# Altium PCB PCB1.PcbDoc
Units mil, origin at the board's own origin, x right, y up, seen from the top; angles counter-clockwise.
Board outline 3425 x 2910 mil, 2 copper layers (Top Layer, Bottom Layer); 8 components, 14 nets, 60 pads, 0 vias.
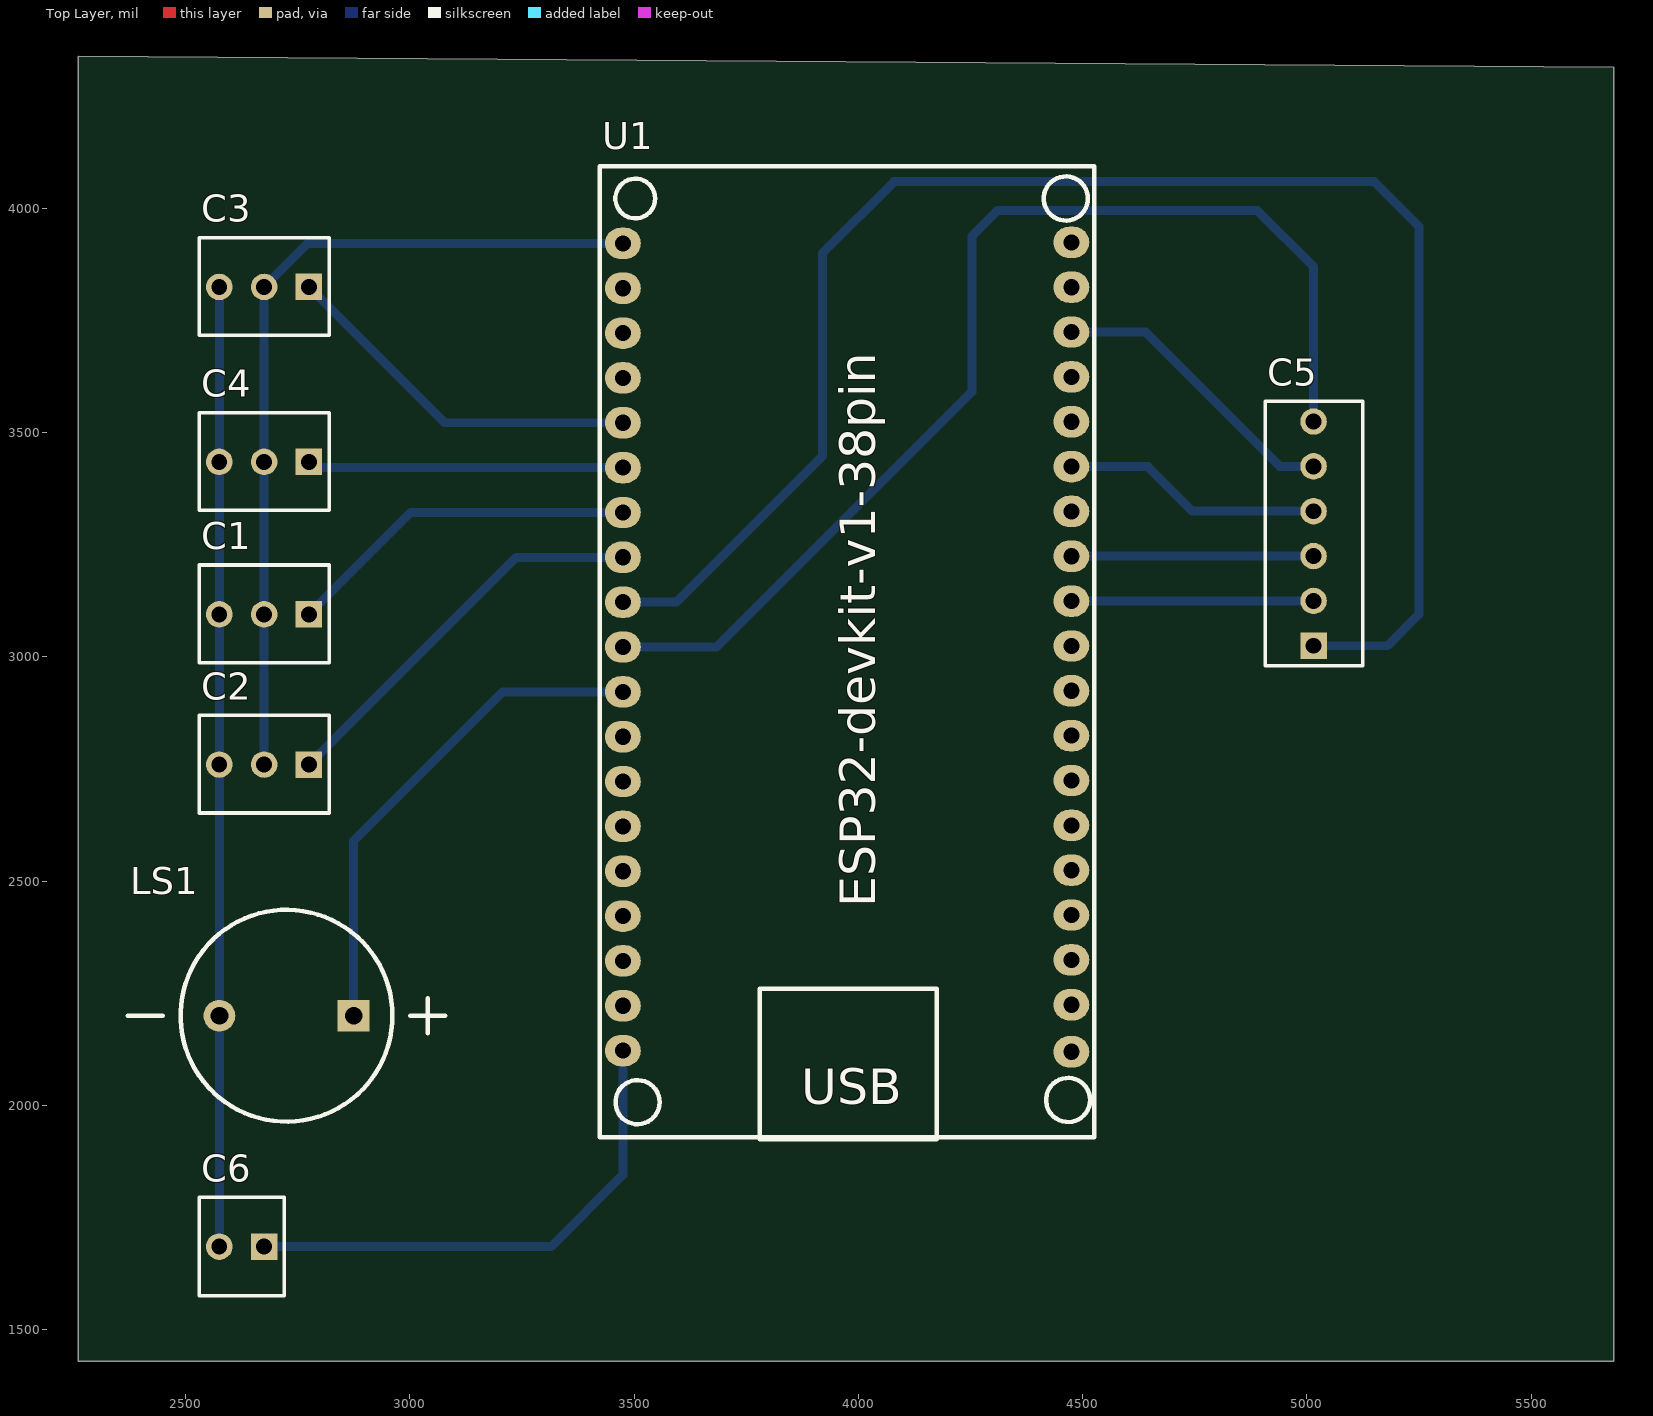
[diagram p0: Top Layer view]
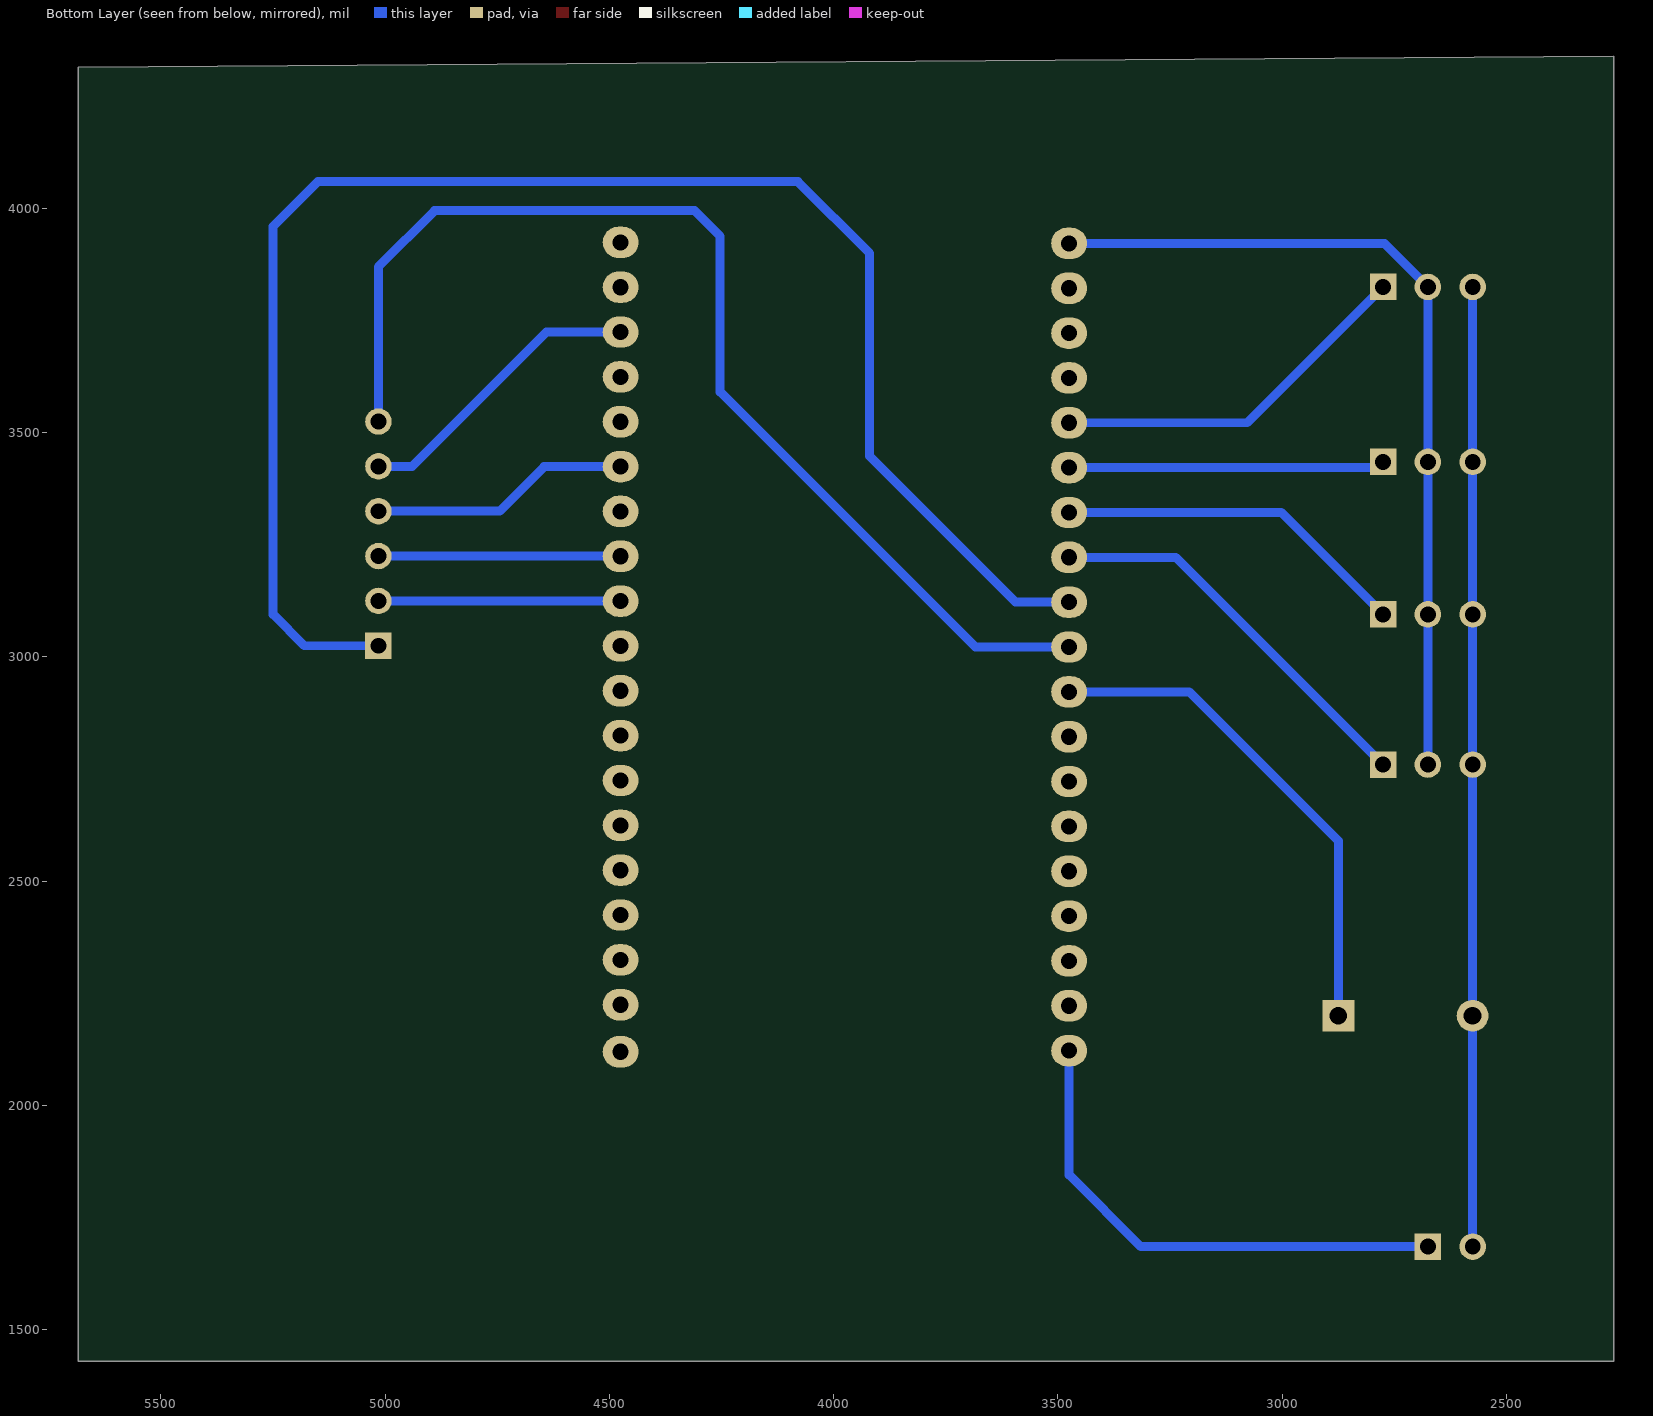
[diagram p1: Bottom Layer view, seen from below]
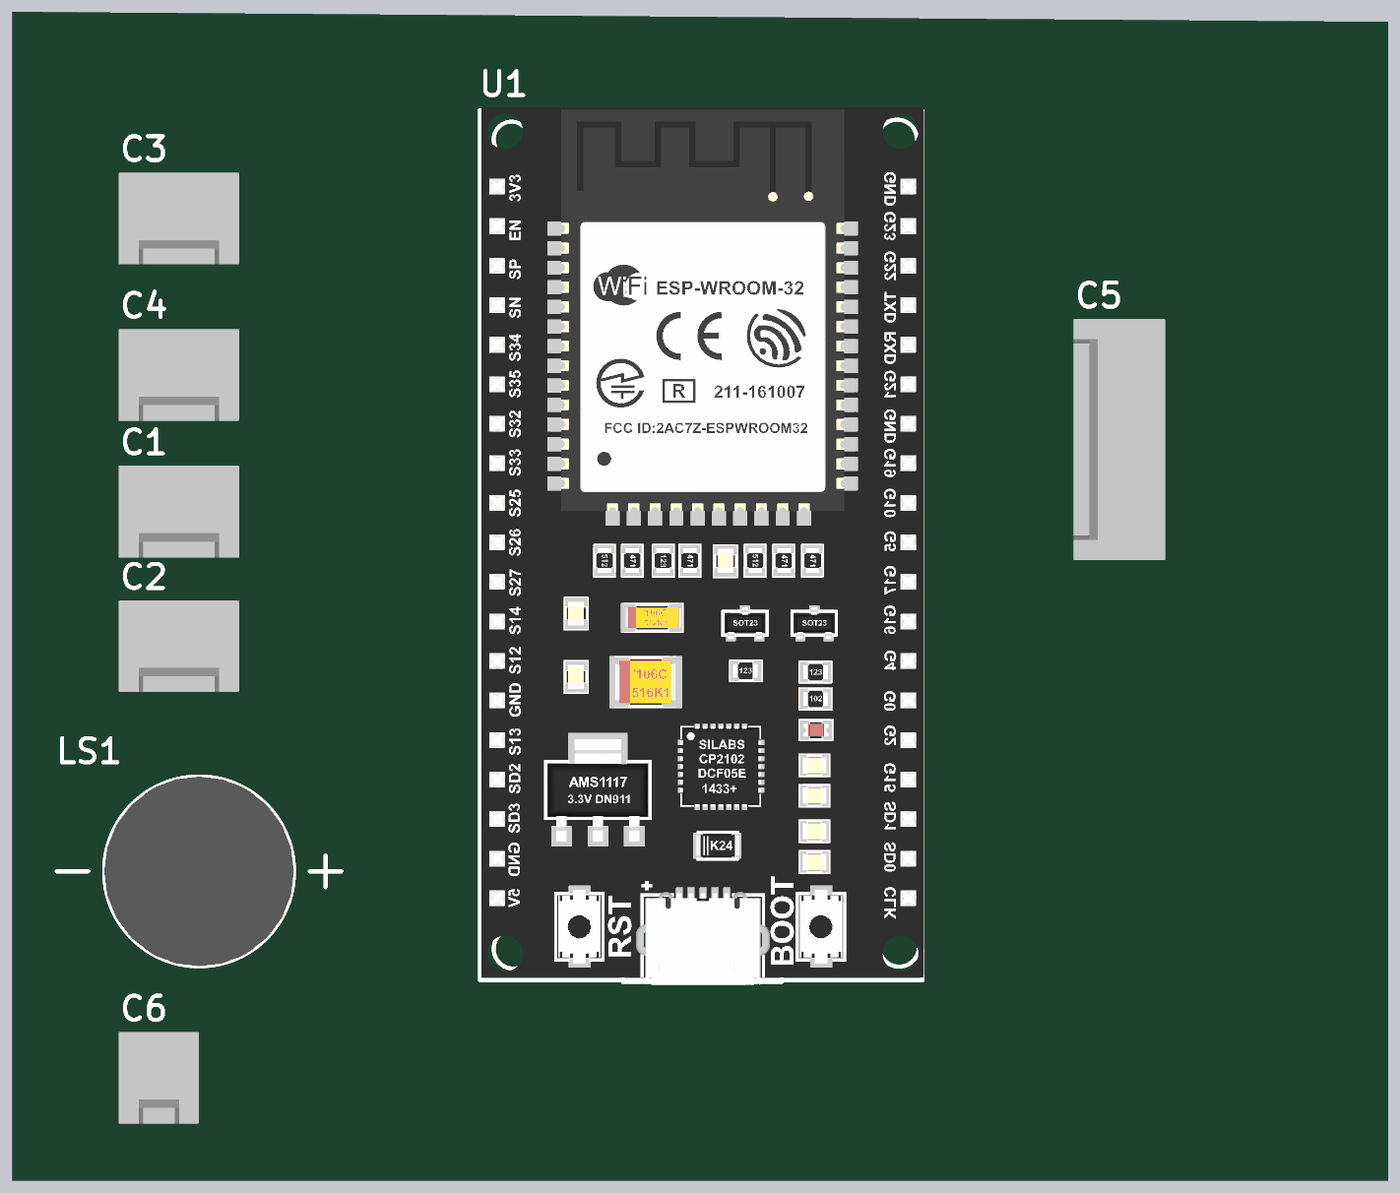
[diagram p2: 3D render of the assembled board from above, using the file's embedded part models]

## Layer stack, top to bottom
Top Solder: solder mask 0.4, Solder Resist, Dk 3.5
Top Layer: signal copper 1.4
Dielectric 1: dielectric 12.6, FR-4, Dk 4.8
Bottom Layer: signal copper 1.4
Bottom Solder: solder mask 0.4, Solder Resist, Dk 3.5

## Board outline
2260,4340 2260,1430 5685,1430 5685,4315

## Design rules (kind name [scope] priority, off if disabled: settings)
Clearance [All] p1: gap=10 ignorepadtopadclearanceinfootprint=FALSE except(0: Arc-Hole Track-Hole SMDPad-Hole THPad-Hole Via-Hole Fill-Hole Poly-Hole Region-Hole Text-Hole)
PolygonConnect [All] p1: connectstyle=Relief reliefconductorwidth=10 reliefentries=4 polygonreliefangle="90 Angle" airgapwidth=10
RoutingLayers [All] p1: top layer_v5=FALSE bottom layer_v5=TRUE
RoutingVias [All] p1: holewidth=28 width=50 viastyle="Through Hole" minholewidth=28 minwidth=50 maxholewidth=28 maxwidth=50
SilkToSolderMaskClearance [IsPad] p1: minsilkscreentomaskgap=0 clearancetoexposedcopper=TRUE
SolderMaskExpansion [All] p1: expansion=4 istentingtop=FALSE
Width [All] p1: maxlimit=25 minlimit=20 preferedwidth=20 minimp=50.000000 maximp=50.000000 favimp=50.000000
28 further rules are at their usual default settings.

## Components (designator, comment, footprint, x,y, rotation, side; value= is the part's Value field where it differs from the comment)
C1 "TT" HDR3 2775,3095 r180 top
C2 "TS" HDR3 2775,2760 r180 top
C3 "PT" HDR3 2775,3825 r180 top
C4 "PS" HDR3 2775,3435 r180 top
C5 "Header6" HDR6 5015,3025 r90 top
C6 "5V" HDR2 2675,1685 r180 top
LS1 "Buzzer" Buzzer-12MM 2725,2200 r180 top
U1 "ESP32-DEVKI-V1.0-PIN38" ESP32-DEVKIT-V1.0-38PIN 3975,3009.61 r0 top

## Footprints (in the part's own frame and the unit in brackets; to place one, negate y for a bottom-side part, rotate by r counter-clockwise, add the part's x,y. Pads: shape width x height; smd on the part's side, far side on the other; paste and mask are expansions set on the pad)
Buzzer-12MM [mm] "12MM"
  rect 1.8x1.8 hole 1: 1(-3.8,0)
  round 1.8 hole 1: 2(3.8,0)
  silkscreen extent -9,-6 9,6, body extent -6,-6 6,6, height 8.6
ESP32-DEVKIT-V1.0-38PIN [mil] "DEVKIT 38 PIN"
  oval 80x70 hole 36: 1(-500,912.59) 2(-500,812.59) 3(-500,712.59) 4(-500,612.59) 5(-500,512.59) 6(-500,412.59) 7(-500,312.59) 8(-500,212.59) 9(-500,112.59) 10(-500,12.59) 11(-500,-87.41) 12(-500,-187.41) 13(-500,-287.41) 14(-500,-387.41) 15(-500,-487.41) 16(-500,-587.41) 17(-500,-687.41) 18(-500,-787.41) 19(-500,-887.41) 20(500,-890.08) 21(500,-785.08) 22(500,-685.08) 23(500,-585.08) 24(500,-485.08) 25(500,-385.08) 26(500,-285.08) 27(500,-185.08) 28(500,-85.08) 29(500,14.92) 30(500,114.92) 31(500,214.92) 32(500,314.92) 33(500,414.92) 34(500,514.92) 35(500,614.92) 36(500,714.92) 37(500,814.92) 38(500,914.92)
  silkscreen extent -551,-1085 551,1085, body extent -547,-1092 555,1092, height 269
HDR2 [mm] "Connector; Header; 2 Position"
  rect 1.5x1.5 hole 0.9: 1(0,0)
  round 1.5 hole 0.9: 2(2.54,0)
  silkscreen extent -1.14,-2.79 3.68,2.77, body extent -1.27,-2.92 3.81,2.88, height 11.72
HDR3 [mm] "Connector; Header; 3 Position"
  rect 1.5x1.5 hole 0.9: 1(0,0)
  round 1.5 hole 0.9: 2(2.54,0) 3(5.08,0)
  silkscreen extent -1.14,-2.79 6.22,2.74, body extent -1.27,-2.92 6.35,2.88, height 11.72
HDR6 [mm] "Connector; Header; 6 Position"
  rect 1.5x1.5 hole 0.9: 1(0,0)
  round 1.5 hole 0.9: 2(2.54,0) 3(5.08,0) 4(7.62,0) 5(10.16,0) 6(12.7,0)
  silkscreen extent -1.14,-2.79 13.84,2.74, body extent -1.27,-2.92 13.97,2.88, height 11.72

## Part data
C1 C2 C3 C4: library part Header3, "Header IDC, 3 x 1 Pin Vertical 2.54mm Pitch (Non-Boxed, Male)", Manufacturer="W¨¹rth Elektronik eiSos GmbH", partNo=613002143121, ComponentLink1 Description=Manufacturer, ComponentLink1URL=http://www.we-online.com, ComponentLink2 Description=Datasheet, ComponentLink2URL=http://katalog.we-online.de/em/datasheet/6130xx143121.pdf, Created by="Karrer Zheng", Created Date="29 March 2013", NoPins=02
C5: "Header IDC, 6 x 1 Pin Vertical 2.54mm Pitch (Non-Boxed, Male)", Manufacturer="W¨¹rth Elektronik eiSos GmbH", partNo=613002143121, ComponentLink1 Description=Manufacturer, ComponentLink1URL=http://www.we-online.com, ComponentLink2 Description=Datasheet, ComponentLink2URL=http://katalog.we-online.de/em/datasheet/6130xx143121.pdf, Created by="Karrer Zheng", Created Date="29 March 2013", NoPins=02
C6: library part Header2, "Header IDC, 2 x 1 Pin Vertical 2.54mm Pitch (Non-Boxed, Male)", Manufacturer="W¨¹rth Elektronik eiSos GmbH", partNo=613002143121, ComponentLink1 Description=Manufacturer, ComponentLink1URL=http://www.we-online.com, ComponentLink2 Description=Datasheet, ComponentLink2URL=http://katalog.we-online.de/em/datasheet/6130xx143121.pdf, Created by="Karrer Zheng", Created Date="29 March 2013", NoPins=02
LS1: Package=None, Availability=Unavailable, MP=CST-951AP, Price=None

## Nets (pads, with @x,y where several pads share a name; then routed paths per layer and width w, separated by ;. In a path a pad name is that pad's centre, name@x,y a point inside that pad or via, vN(x,y) a via of type N, cw(c..) or ccw(c..) an arc to the next point about the centre after c; other vN are vias at no path point)
GND: C1.3 C2.3 C3.3 C4.3 C6.2 LS1.2 | length 2140.3
  Bottom Layer w20: C6.2 2575,1942 2575.39,1942.39 LS1.2 2575.39,2479 2575,2479.39 C2.3 C1.3 C4.3 C3.3
NetC1_1: C1.1 U1.7 | length 794.1
  Bottom Layer w20: C1.1 3002.2,3322.2 U1.7
NetC1_2: C1.2 C2.2 C3.2 C4.2 U1.1 | length 1905.3
  Bottom Layer w20: C2.2 C1.2 C4.2 C3.2 2772.2,3922.2 U1.1
NetC2_1: C2.1 U1.8 | length 891.4
  Bottom Layer w20: C2.1 3237.2,3222.2 U1.8
NetC3_1: C3.1 U1.5 | length 825.4
  Bottom Layer w20: C3.1 3077.8,3522.2 U1.5
NetC4_1: C4.1 U1.6 | length 705.3
  Bottom Layer w20: C4.1 2787.8,3422.2 U1.6
NetC5_1: C5.1 U1.9 | length 3598.7
  Bottom Layer w20: U1.9 3594.24,3122.2 3920,3447.96 3920,3900 4080,4060 5150,4060 5250,3960 5250,3095 5180,3025 C5.1
NetC5_2: C5.2 U1.30 | length 540.2
  Bottom Layer w20: U1.30 4475.24,3124.76 5014.76,3124.76 C5.2
NetC5_3: C5.3 U1.31 | length 540.2
  Bottom Layer w20: U1.31 4475.24,3224.76 5014.76,3224.76 C5.3
NetC5_4: C5.4 U1.33 | length 581.2
  Bottom Layer w20: U1.33 4645.48,3424.52 4745,3325 C5.4
NetC5_5: C5.5 U1.36 | length 664.1
  Bottom Layer w20: U1.36 4640.48,3724.52 4940,3425 C5.5
NetC5_6: C5.6 U1.10 | length 2543
  Bottom Layer w20: U1.10 3684.2,3022.2 4253,3591 4253,3938 4310,3995 4890,3995 5015,3870 C5.6
NetC6_1: C6.1 U1.19 | length 1143.5
  Bottom Layer w20: C6.1 3315,1685 3475,1845 U1.19
NetLS1_1: LS1.1 U1.11 | length 1127.8
  Bottom Layer w20: LS1.1 2874.61,2589.61 3207.2,2922.2 U1.11
pads on no net: U1.2 U1.3 U1.4 U1.12 U1.13 U1.14 U1.15 U1.16 U1.17 U1.18 U1.20 U1.21 U1.22 U1.23 U1.24 U1.25 U1.26 U1.27 U1.28 U1.29 U1.32 U1.34 U1.35 U1.37 U1.38

## Text inside footprints (layer, text, board x,y; h text height)
U1: Top Overlay "USB" at 3872.64,2002.19 h80; Top Overlay "ESP32-devkit-v1-38pin" at 4037.64,2442.19 h80 r90